# Altium PCB PCB1.PcbDoc (part 3 of 4)
Units mm, origin at the board's own origin, x right, y up, seen from the top; angles counter-clockwise.
Board outline 134.12 x 116.9 mm, 4 copper layers (Top Layer, Layer 1, Layer 2, Bottom Layer), stack 1.312 mm thick; 317 components, 155 nets, 807 pads, 898 vias.
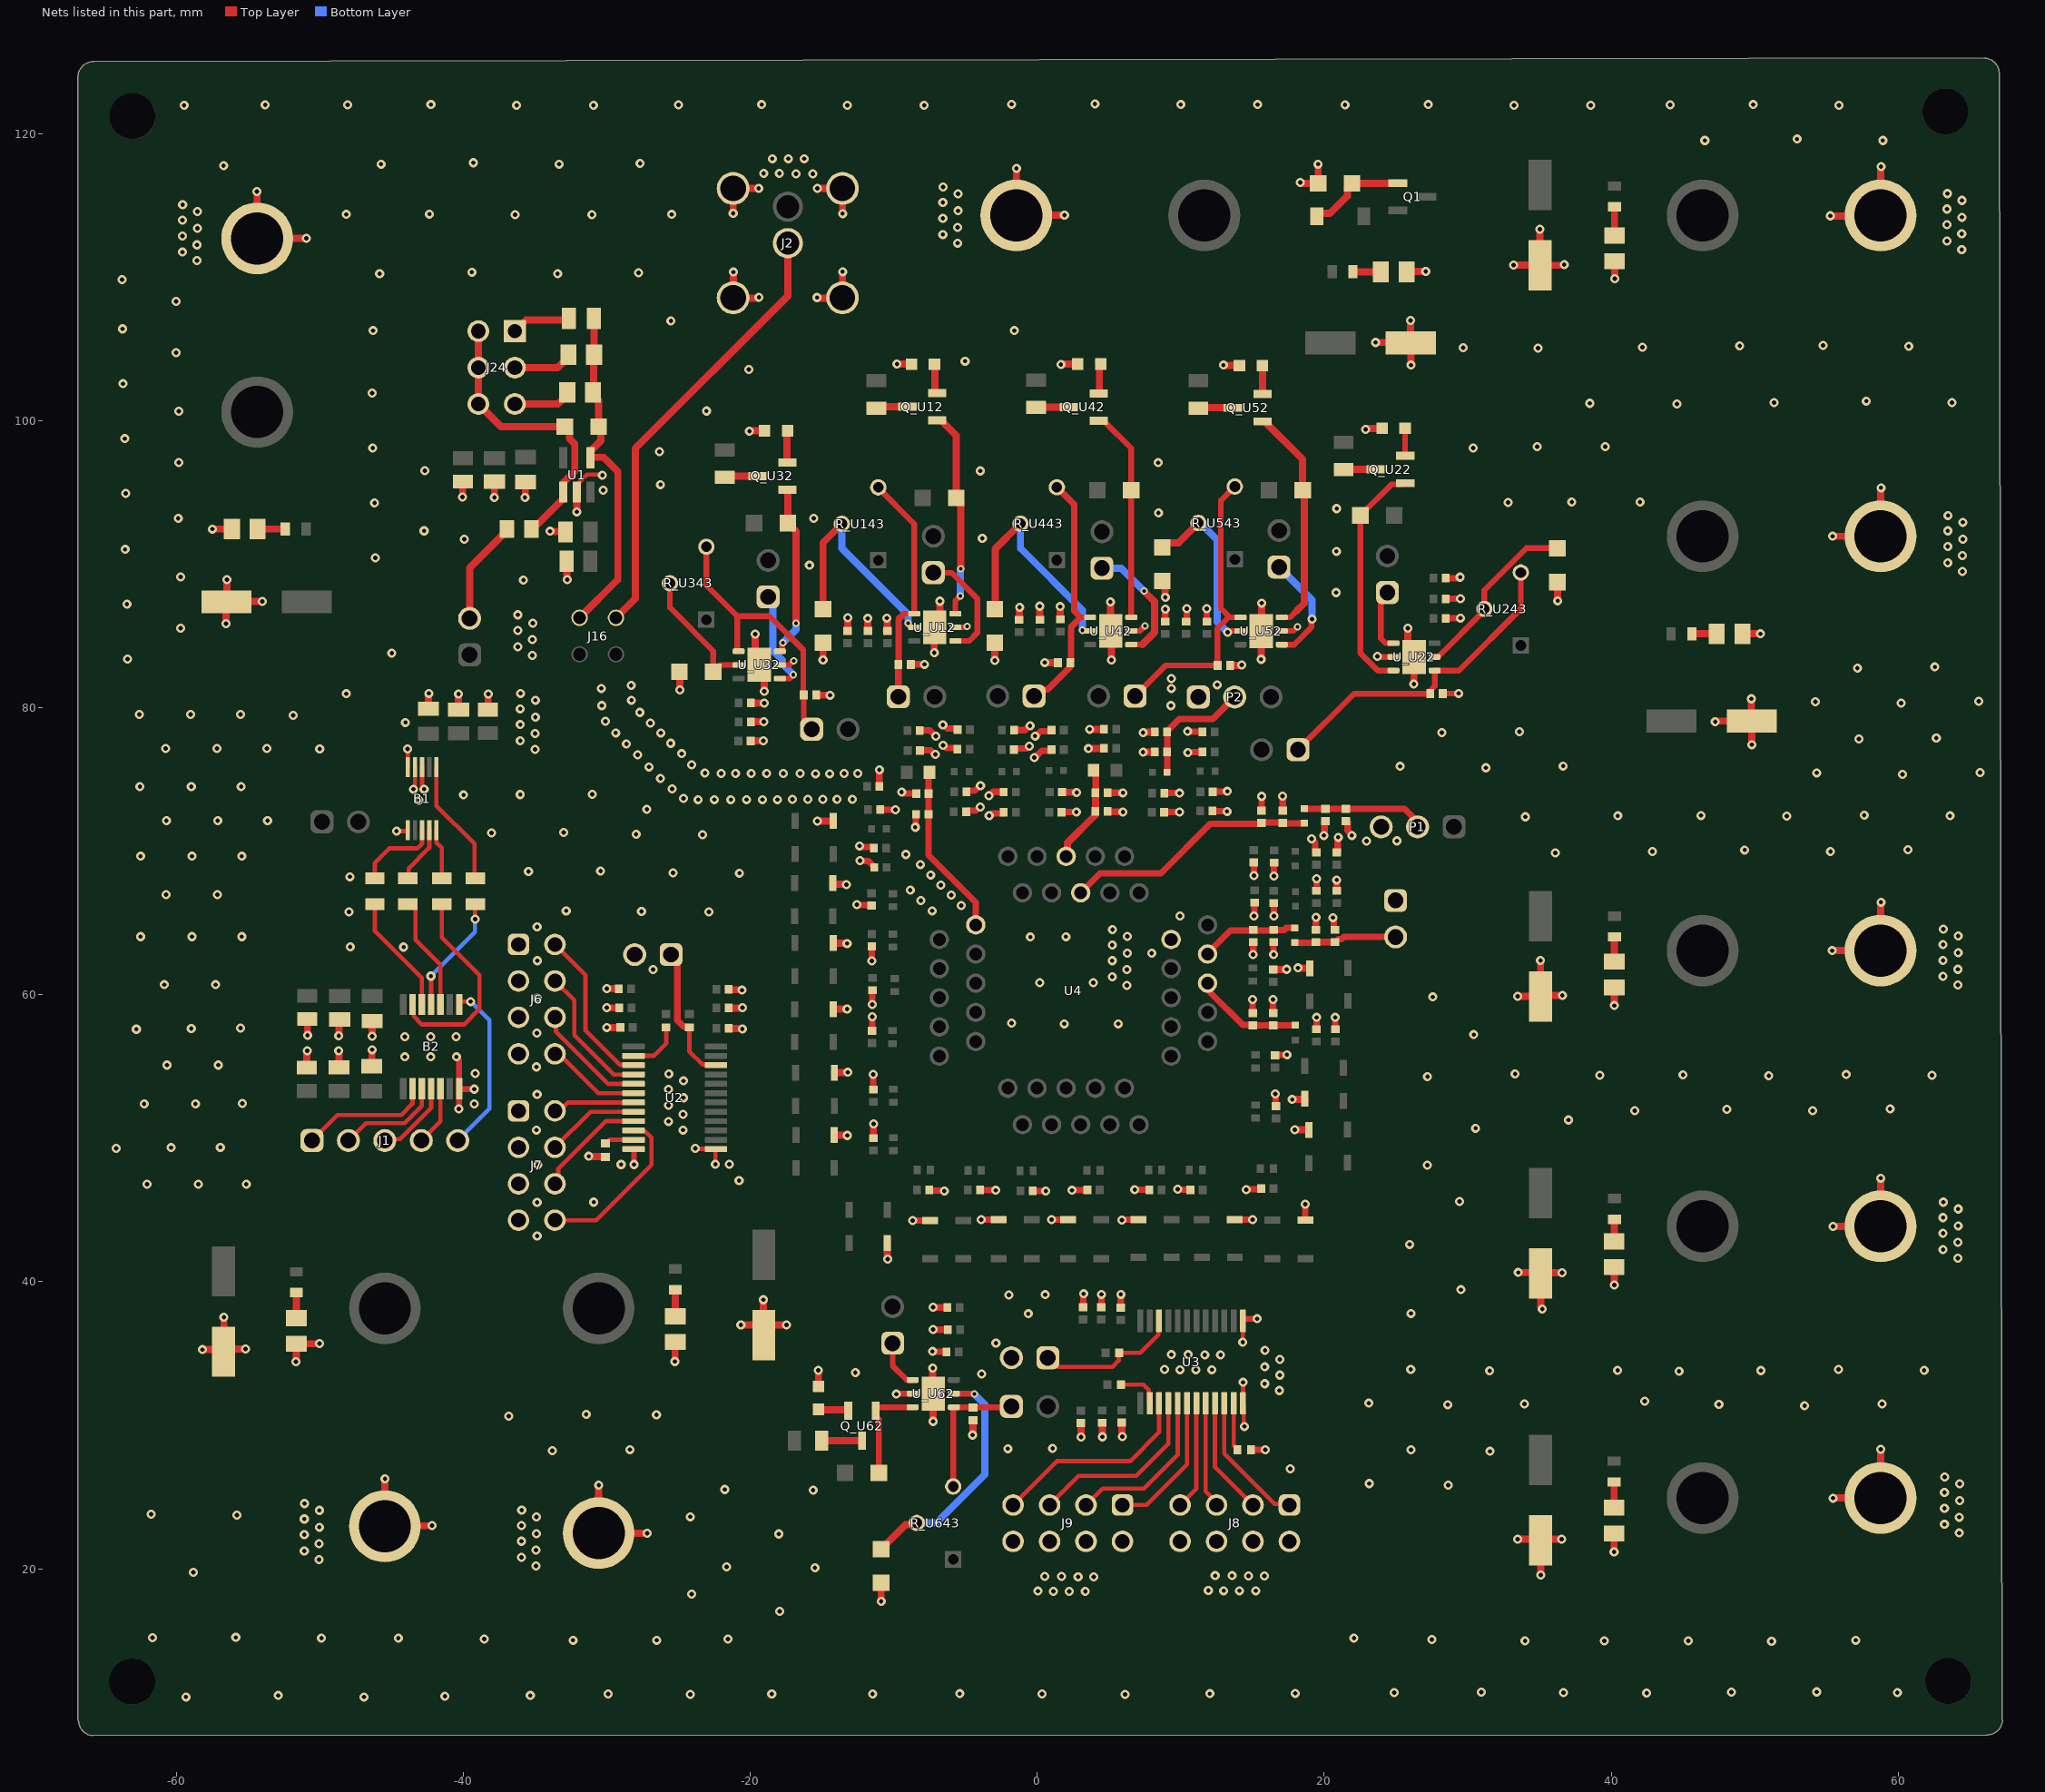
[diagram p5: the nets of this part, all layers, seen from the top]

## Via types
v1: diameter 0.635, hole 0.305, Top Layer to Bottom Layer, 880 vias
v2: diameter 0.508, hole 0.254, Top Layer to Bottom Layer, 17 vias
v3: diameter 0.504, hole 0.254, Top Layer to Bottom Layer, 1 vias

## Nets (pads, with @x,y where several pads share a name; then routed paths per layer and width w, separated by ;. In a path a pad name is that pad's centre, name@x,y a point inside that pad or via, vN(x,y) a via of type N, cw(c..) or ccw(c..) an arc to the next point about the centre after c; other vN are vias at no path point) (continued)
CHIPS_VSS: B1.3 B1.4 B1.5 B1.6 B2.7 C2.1 C3.1 C4.1 C5.1 C6.1 C7.1 C8.1 C9.1 C10.1 C11.1 C12.1 C13.1 C14.2 C15.1 C16.2 C17.1 C18.1 C19.1 C20.1 C21.1 C22.1 C23.1 C24.1 C25.1 C26.1 C27.1 C28.1 C29.1 C30.1 C31.2 C32.1 C33.2 C34.1 C35.1 C36.1 C37.1 C38.1 C39.1 C40.1 C41.1 C42.1 C43.1 C44.1 C45.1 C46.1 C47.1 C48.1 C49.1 C50.1 C51.1 C52.1 C53.1 C54.1 C55.1 C56.1 C57.2 C58.1 C59.1 C60.1 C62.1 C63.1 C67.1 C68.1 C69.1 C70.2 C71.1 C72.1 C73.1 C75.2 C76.1 C77.1 C78.1 C79.2 C80.1 C81.1 C86.1 C87.1 C88.1 C89.1 C90.1 C91.1 C92.1 C93.1 C94.1 C95.1 C96.1 C97.1 C98.1 C99.1 C100.1 C101.1 C102.1 C103.1 C104.2 C105.1 C106.1 C_U164.1 C_U165.1 C_U166.1 C_U167.1 C_U182.1 C_U183.1 C_U184.1 C_U185.1 C_U264.1 C_U265.1 C_U266.1 C_U267.1 C_U282.1 C_U283.1 C_U284.1 C_U285.1 C_U364.1 C_U365.1 C_U366.1 C_U367.1 C_U382.1 C_U383.1 C_U384.1 C_U385.1 C_U464.1 C_U465.1 C_U466.1 C_U467.1 C_U482.1 C_U483.1 C_U484.1 C_U485.1 C_U582.1 C_U583.1 C_U584.1 C_U585.1 C_U682.1 C_U683.1 C_U684.1 C_U685.1 D_U12.2 D_U14.2 D_U16.2 D_U18.2 D_U19.1 D_U22.2 D_U24.2 D_U26.2 D_U28.2 D_U29.1 D_U32.2 D_U34.2 D_U36.2 D_U38.2 D_U39.1 D_U42.2 D_U44.2 D_U46.2 D_U48.2 D_U49.1 D_U59.1 D_U69.1 J2.3 J2.4 J2.5 J2.6 J3.1 J6.1 J6.3 J6.5 J6.7 J7.1 J7.3 J7.5 J7.7 J8.2 J8.4 J8.6 J8.8 J9.2 J9.4 J9.6 J9.8 J18.1 J19.1 J20.1 J21.1 J22.1 J23.1 J25.1 J30.2 J31.2 J32.1 J33.1 P1.3 P2.1 R25.2 R26.2 R33.1 R_U17.1 R_U27.1 R_U37.1 R_U47.1 R_U57.1 R_U67.1 U1.2 U2.12 U2.13 U3.12 U3.13 U4.34 U_U12.2 U_U12.7 U_U22.2 U_U22.7 U_U32.2 U_U32.7 U_U42.2 U_U42.7 U_U52.2 U_U52.7 U_U62.2 U_U62.7 | length 346.8
  Top Layer w0.3: v1(-44.65,71.4) -43.863,71.4 B1.6@-43.863,71.465 ; v1(-43.875,77.125) -43.863,77.113 B1.5@-43.863,75.865 ; v1(-43.475,74.325) -43.475,74.416 -43.363,74.527 B1.4@-43.363,75.865 ; B1.3@-42.863,75.865 -42.863,74.554 -42.725,74.416 v1(-42.725,74.325) ; U1.2@-32.077,95.025 -31.948,95.155 -31.948,95.677 -31.375,96.25 -30.35,96.25 v1(-30.3,96.2) ; v1(-23.825,49.3) -23.798,49.273 U2.13@-22.327,49.273 ; v1(-22.425,48.2) -22.425,49.207 U2.13@-22.4,49.232 ; U3.12@14.3,31.45 14.395,31.355 14.395,29.98 v1(14.45,29.925) ; U3.12@14.325,31.825 14.345,31.845 14.345,32.995 v1(14.35,33) ; v1@14.325,35.825 14.333,35.833 14.333,37.272 U3.13@14.341,37.28
  Top Layer w0.4: v1(-40.475,55.675) -40.475,55.638 -40.283,55.446 B2.7@-40.283,53.45 -40.291,53.442 -40.291,52.059 v1(-40.3,52.05) ; B2.7@-40.258,53.475 -40.258,53.425 v1(-39.225,53.425) ; U2.12@-28.126,49.245 -28.105,49.245 -28.1,49.24 v1(-28.1,48.175) ; U_U32.2@-17.935,82.985 -17.267,82.985 -16.977,83.275 v2(-16.975,83.275) ; v1(-9.825,32.175) -9.79,32.21 U_U62.2@-8.679,32.21 ; U_U12.2@-5.7,85.602 -4.95,85.602 -4.877,85.675 v2(-4.875,85.675) ; U_U42.2@6.554,85.351 7.149,85.351 7.498,85.7 v2(7.5,85.7) ; U3.13@14.341,37.28 14.341,37.42 14.346,37.425 v1(15.325,37.425) ; U_U52.2@17.045,85.347 17.847,85.347 v3(18.15,85.65) ; v1(23.7,83.575) 23.732,83.543 U_U22.2@24.828,83.543 ; C_U282.1@28.272,80.987 v1@29.413,80.987
  Top Layer w0.45: v1(-12.575,66.275) -12.546,66.246 -11.543,66.246 C_U464.1@-11.53,66.233 ; v1(-12.375,70.375) -12.325,70.375 -12.25,70.3 -11.425,70.3 -11.375,70.25 C86.1@-11.375,70.225 ; v1(-12.35,69.35) -12.315,69.315 -11.762,69.315 -11.35,68.903 C87.1@-11.35,68.85 ; v1(-11.525,62.35) C_U466.1@-11.525,63.373 ; C_U467.1@-11.5,57.461 v1(-11.5,58.475) ; v1(-11.5,59.325) -11.482,59.343 C_U465.1@-11.482,60.315 ; C_U264.1@-11.425,53.402 v1(-11.425,54.45) ; C_U266.1@-11.412,50.009 -11.412,50.988 v1(-11.4,51) ; C48.1@-11,72.925 C48.1@-10.963,72.963 ; C49.1@-11,74.823 v1(-11,75.675) ; C48.1@-10.948,72.9 v1(-9.875,72.9) ; v1(-9.45,74.125) -9.4,74.125 -9.3,74.025 C43.1@-8.427,74.025 ; v1(-8.675,44.275) D_U24.2@-7.45,44.275 ; v1(-8.5,71.675) -8.466,71.709 -8.466,72.541 C47.1@-8.432,72.575 ; C58.1@-8.189,78.423 -7.473,78.423 v1(-7.075,78.025) ; C36.1@-8.175,77.015 -8.134,77.015 -8.123,77.025 -7.426,77.025 -7.15,76.75 v1(-7.1,76.75) ; C_U267.1@-7.536,46.393 -7.504,46.36 -6.51,46.36 v1(-6.475,46.325) ; v1(-7.3,35.15) -7.275,35.125 -6.352,35.125 C_U685.1@-6.327,35.1 ; v1(-7.25,36.675) -7.238,36.662 -6.24,36.662 C_U684.1@-6.227,36.65 ; v1(-7.25,38.225) -7.238,38.213 -6.304,38.213 -6.279,38.188 C_U683.1@-6.279,38.175 ; v1(-6.575,78.8) -6.525,78.8 -6.28,78.555 -5.598,78.555 C71.1@-5.598,78.55 ; v1(-6.55,77.375) -6.5,77.375 -6.325,77.2 -5.604,77.2 -5.604,77.154 C59.1@-5.55,77.1 ; C92.1@-4.939,74.125 -4.939,74.164 -4.878,74.225 -4.35,74.225 -4,74.575 v1(-3.95,74.575) ; C93.1@-4.93,72.737 -4.93,72.798 -4.903,72.825 -4.275,72.825 -4.025,73.075 v1(-3.975,73.075) ; C_U265.1@-3.987,46.373 -3.974,46.385 -2.91,46.385 v1(-2.9,46.375) ; v1(-3.9,44.325) D_U32.2@-2.681,44.325 ; v1(-3.375,73.875) -3.325,73.875 -3.062,74.137 -2.382,74.137 -2.369,74.125 C98.1@-2.332,74.125 ; v1(-3.35,72.475) -3.3,72.475 -3.125,72.65 -2.382,72.65 C99.1@-2.382,72.725 ; C67.1@-1.636,78.444 -0.849,78.444 -0.543,78.75 v1(-0.5,78.75) ; C72.1@-1.622,77.101 -1.573,77.15 -0.775,77.15 -0.6,77.325 v1(-0.55,77.325) ; C_U364.1@-0.35,46.325 v1(0.6,46.325) ; v1(-0.2,76.525) -0.15,76.525 0.323,76.998 0.945,76.998 1.017,77.07 C63.1@1.017,77.073 ; v1(-0.15,78.025) -0.115,78.06 -0.063,78.06 0.24,78.363 0.945,78.363 1.017,78.435 C62.1@1.017,78.438 ; v1(1,44.325) D_U36.2@2.15,44.325 ; C95.1@1.697,72.725 v1(2.725,72.725) ; C94.1@1.736,74.141 1.765,74.112 2.738,74.112 v1(2.75,74.1) ; v1(2.425,46.375) 2.435,46.385 3.501,46.385 C_U366.1@3.513,46.398 ; C106.1@3.208,38.213 3.217,38.222 3.217,39.148 v1(3.234,39.165) ; C29.1@4.467,38.173 4.467,39.117 v1(4.475,39.125) ; C39.1@4.85,74.075 v1(5.975,74.075) ; C40.1@4.925,72.775 4.95,72.75 5.95,72.75 v1(5.975,72.725) ; v1(5.825,39.125) C28.1@5.825,38.197 5.825,38.177 C28.1@5.837,38.165 ; v1@5.925,44.325 D_U38.2@7.066,44.325 ; v1(6.8,46.425) 6.807,46.418 C_U367.1@7.829,46.418 ; C97.1@8.837,72.737 8.85,72.725 v1(9.925,72.725) ; C96.1@8.837,74.037 8.85,74.05 v1(9.925,74.05) ; v1(8.925,86.875) 8.925,86.031 C_U583.1@8.975,86.031 ; v1@9.82,46.43 C_U365.1@10.677,46.43 ; v1(10.425,86.9) 10.425,86.029 C_U584.1@10.439,86.029 ; v1(10.475,78.35) 10.494,78.331 C37.1@11.512,78.331 ; v1(10.5,76.875) 10.524,76.899 C38.1@11.519,76.899 ; C_U585.1@11.825,85.975 v1(11.825,86.9) ; C52.1@12.2,72.823 12.236,72.787 13.213,72.787 v1(13.225,72.775) ; C51.1@12.237,74.162 13.237,74.162 v1(13.25,74.175) ; D_U34.2@13.761,44.325 v1(15,44.325) ; v1(14.575,46.425) 14.605,46.455 15.641,46.455 C_U164.1@15.661,46.475 ; R26.2@14.895,28.275 14.92,28.3 v1(15.9,28.3) ; C35.1@15.02,58.725 15.01,58.735 15.01,59.635 v1@15.025,59.65 ; v1(15.05,62.8) 15.058,62.808 15.058,63.653 C89.1@15.066,63.661 ; C60.1@15.071,69.202 15.074,69.2 C60.1@15.1,69.2 ; v1(15.1,65.5) v1@15.134,65.534 ; v1(15.1,68.3) C60.1@15.1,69.2 ; C60.1@15.125,69.225 C60.1@15.1,69.2 ; C73.1@15.134,66.416 v1@15.134,65.534 ; v1@15.142,65.526 v1@15.134,65.534 ; C60.1@15.15,69.2 C60.1@15.1,69.2 ; C91.1@15.625,72.825 15.637,72.837 15.637,73.812 v1(15.65,73.825) ; v1(16.425,59.675) 16.43,59.67 16.43,58.73 C19.1@16.435,58.725 ; v1@16.474,68.301 v1(16.5,68.275) C55.1@16.5,69.198 16.5,69.2 C55.1@16.498,69.202 ; v1@16.475,62.825 C88.1@16.475,63.678 C88.1@16.475,63.7 ; v1(16.5,65.5) C69.1@16.5,66.35 ; C69.1@16.508,66.416 C69.1@16.513,66.416 ; v1(16.6,53.1) 16.626,53.074 16.626,52.26 C_U166.1@16.664,52.223 ; C_U165.1@16.6,55.775 16.627,55.802 17.377,55.802 v1(17.4,55.825) ; v1(17.1,73.85) 17.113,73.838 17.113,72.84 C90.1@17.125,72.827 ; D_U12.2@18.675,44.325 18.68,44.325 18.68,45.395 v1(18.675,45.4) ; v1(19.125,70.875) 19.125,70.825 19.385,70.565 19.385,69.972 19.425,69.972 C42.1@19.472,69.925 ; C50.1@19.42,64.521 v1@19.42,65.395 ; C46.1@19.46,67.226 19.468,67.233 19.468,68.068 v1(19.475,68.075) ; C18.1@19.475,57.675 v1(19.475,58.425) ; v1(19.975,71.1) 19.975,71.15 20.025,71.2 20.025,72.046 C54.1@20.05,72.046 ; v1(20.6,65.375) 20.6,65.325 20.675,65.25 20.675,64.575 20.7,64.55 C53.1@20.75,64.55 ; C17.1@20.775,57.675 v1(20.775,58.425) ; C41.1@20.85,69.9 20.868,69.9 20.94,69.972 20.94,70.94 v1(20.975,70.975) ; C45.1@20.875,67.251 v1(20.875,68) ; C20.1@21.576,72.075 21.605,72.075 21.632,72.048 21.632,71.443 21.925,71.15 v1(21.925,71.1) ; C_U285.1@28.442,86.227 28.454,86.239 29.489,86.239 v1(29.5,86.25) ; C_U284.1@28.443,87.597 29.497,87.597 v1(29.5,87.6) ; C_U283.1@28.5,89.025 29.35,89.025 29.425,89.1 v1(29.475,89.1)
  Top Layer w0.5: v1(-58.175,35.275) -56.7,35.275 C14.2@-56.675,35.25 ; v1(-57.475,92.45) -56.2,92.45 C30.1@-56.1,92.35 ; C14.2@-56.7,35.125 C14.2@-56.675,35.15 ; v1@-56.675,37.5 C14.2@-56.675,35.25 ; v1(-56.525,85.85) -56.525,86.95 C33.2@-56.4,87.075 ; C33.2@-56.525,87.325 -56.45,87.4 v1(-54,87.4) ; C33.2@-56.475,87.55 v1(-56.475,88.925) ; v1@-55.2,35.3 -55.225,35.325 -56.5,35.325 C14.2@-56.675,35.15 ; v1(-54.375,115.975) -54.364,115.964 -54.364,112.739 -54.325,112.7 v1(-50.925,112.7) ; C13.1@-51.7,35.675 -51.637,35.612 -51.637,34.438 v1(-51.65,34.425) ; C13.1@-51.625,35.55 -51.491,35.684 -50.029,35.684 v1(-50.024,35.689) ; C9.1@-50.906,54.919 -50.89,54.934 -50.89,56.085 v1(-50.875,56.1) ; v1(-50.85,57.175) -50.853,57.178 -50.853,58.272 C12.1@-50.85,58.275 ; v1(-48.675,56.1) -48.665,56.09 -48.665,54.947 C10.1@-48.656,54.937 ; v1(-48.675,57.15) -48.649,57.176 C11.1@-48.649,58.249 ; C11.1@-48.631,58.253 C11.1@-48.607,58.277 ; C80.1@-46.371,55.026 -46.36,55.036 -46.36,56.165 v1(-46.35,56.175) ; v1(-46.35,57.1) -46.351,57.101 -46.351,58.149 C81.1@-46.225,58.275 ; v1(-45.45,26.275) -45.456,26.269 -45.456,22.981 J32.1@-45.425,22.95 ; J32.1@-45.325,23.075 -45.249,22.999 -42.201,22.999 v1(-42.175,23.025) ; C8.1@-42.425,79.92 -42.413,79.933 -42.413,80.962 v1@-42.425,80.975 ; v1@-40.35,80.925 -40.325,80.9 C7.1@-40.325,79.87 ; v1@-40.025,94.675 -40.037,94.687 -40.037,95.752 C3.1@-40.025,95.765 ; C6.1@-38.275,79.86 -38.263,79.872 -38.263,80.913 v1@-38.225,80.95 ; v1@-37.825,94.725 C4.1@-37.825,95.755 ; v1@-35.65,94.675 -35.675,94.7 -35.675,95.705 C5.1@-35.65,95.73 ; v1(-33.95,92.3) -33.925,92.275 -32.95,92.275 C105.1@-32.875,92.2 ; C2.1@-32.799,90.101 -32.772,90.074 -32.772,88.947 v1(-32.75,88.925) ; U1.2@-32.076,94.724 -32.076,93.651 v1(-32.075,93.65) ; v1(-31.25,48.75) -31.227,48.727 -30.114,48.727 R25.2@-30.091,48.704 ; J23.1@-30.675,22.5 -30.658,22.483 J23.1@-30.555,22.483 ; v1(-30.55,25.825) -30.555,25.82 J23.1@-30.555,22.483 ; J23.1@-30.5,22.25 -30.555,22.305 J23.1@-30.555,22.483 ; v1(-30,57.725) -29.986,57.711 -29.12,57.711 C23.1@-29.106,57.698 ; v1(-30,59.1) -29.984,59.084 -29.117,59.084 C22.1@-29.101,59.069 ; v1(-30,60.425) C100.1@-29.157,60.425 ; v1(-27.175,22.475) -27.183,22.483 J23.1@-30.555,22.483 ; v1(-25.25,34.45) -25.237,34.463 -25.237,35.712 C78.1@-25.25,35.725 ; v1(-24.9,81.25) -24.912,81.262 -24.912,82.36 R_U37.1@-24.825,82.447 ; C24.1@-21.525,57.653 -21.51,57.637 -20.562,57.637 v1(-20.55,57.625) ; C101.1@-21.51,60.425 -21.51,60.38 -21.48,60.35 -20.6,60.35 v1(-20.575,60.325) ; C25.1@-21.498,59.075 v1@-20.57,59.075 ; J2.6@-21.225,116.15 -21.194,116.181 v1@-19.413,116.181 ; J2.4@-21.2,108.525 -19.505,108.525 -19.424,108.606 v1(-19.388,108.606) ; J2.4@-21.2,108.6 -21.177,108.623 -21.177,110.342 v1(-21.163,110.356) ; J2.6@-21.2,116.1 -21.189,116.089 -21.189,114.457 v1(-21.188,114.456) ; v1(-20.65,37) C104.2@-19.175,37 ; v1(-20.05,99.275) -20.038,99.288 -18.962,99.288 D_U39.1@-18.95,99.3 ; C_U383.1@-19.95,77.7 v1(-19.075,77.7) ; C_U385.1@-19.95,80.325 C_U385.1@-19.948,80.325 v1(-19.025,80.325) ; C_U384.1@-19.9,79 -19.875,79.025 v1(-19.05,79.025) ; v1(-19.65,85.125) -19.65,83.35 U_U32.7@-19.35,83.05 ; U_U32.7@-19.37,82.985 -19.025,82.64 v1(-19.025,81.15) ; C104.2@-19.225,36.95 C104.2@-19.175,37 ; v1(-19.075,38.75) C104.2@-19.075,37 ; C104.2@-18.975,36.475 -19.075,36.575 C104.2@-19.075,36.95 ; C104.2@-18.75,36.625 C104.2@-19.075,36.95 ; v1(-17.475,37) C104.2@-19.075,37 ; C_U382.1@-15.375,80.875 v1(-14.425,80.875) ; v1(-15.338,108.581) -15.301,108.581 -15.245,108.525 J2.3@-13.625,108.525 ; v1(-15.325,72.1) -14.21,72.1 D_U42.2@-14.21,71.94 ; v1@-15.312,116.181 J2.5@-13.567,116.181 ; v1(-15.25,33.825) -15.242,33.817 D_U69.1@-15.242,32.668 ; R_U17.1@-14.95,84.32 -14.925,84.295 v1(-14.925,83.325) ; D_U46.2@-14.25,67.776 -14.25,67.701 -13.326,67.701 v1(-13.3,67.675) ; D_U44.2@-14.22,63.601 -14.22,63.588 -13.263,63.588 v1(-13.25,63.575) ; D_U48.2@-14.21,59.003 -13.253,59.003 v1(-13.25,59) ; D_U26.2@-14.141,50.24 -14.141,50.22 -13.245,50.22 v1(-13.225,50.2) ; D_U22.2@-14.134,54.558 -14.134,54.579 -13.221,54.579 v1(-13.2,54.6) ; J2.3@-13.6,108.575 -13.567,108.608 -13.567,110.377 v1(-13.563,110.381) ; J2.5@-13.6,116.225 -13.567,116.192 J2.5@-13.567,116.181 ; v1(-13.563,114.431) -13.567,114.435 J2.5@-13.567,116.181 ; J2.5@-13.475,116.175 -13.481,116.181 J2.5@-13.567,116.181 ; C_U183.1@-13.215,85.325 -13.208,85.333 -13.208,86.267 v1(-13.2,86.275) ; C_U184.1@-11.813,85.351 -11.801,85.363 v1@-11.801,86.224 ; v1@-10.875,17.762 R_U67.1@-10.875,18.574 ; C_U185.1@-10.501,85.379 C_U185.1@-10.473,85.352 ; C_U185.1@-10.475,85.35 C_U185.1@-10.473,85.352 ; v1(-10.475,86.25) -10.461,86.236 -10.461,85.364 C_U185.1@-10.473,85.352 ; D_U28.2@-10.439,42.716 -10.439,41.589 v1(-10.425,41.575) ; C_U185.1@-10.435,85.334 -10.456,85.334 C_U185.1@-10.473,85.352 ; v1(-9.775,103.95) -9.762,103.937 -8.725,103.937 D_U19.1@-8.712,103.923 ; C_U182.1@-8.8,83.021 -8.77,83.051 C_U182.1@-8.77,83.086 ; C_U182.1@-8.75,83 -8.725,83.025 v1(-7.85,83.025) ; U_U62.7@-7.275,32.25 v1(-7.275,34) ; v1(-7.25,30.275) -7.25,32.204 U_U62.7@-7.244,32.21 ; v1@-7.201,83.799 v1(-7.175,83.825) -7.175,85.562 U_U12.7@-7.135,85.602 -6.775,85.962 v1(-6.775,87.425) ; C92.1@-4.964,74.15 C92.1@-4.939,74.125 ; v1(-4.5,29.325) -4.481,29.344 -4.481,30.342 C_U682.1@-4.463,30.361 ; R_U47.1@-2.955,84.524 -2.953,84.521 -2.953,83.303 v1(-2.95,83.3) ; J19.1@-1.5,114.275 -1.452,114.323 -1.452,117.573 v1(-1.45,117.575) ; J19.1@-1.425,114.3 -1.413,114.312 1.887,114.312 v1(1.9,114.325) ; C_U483.1@-1.261,86.11 -1.243,86.128 -1.243,86.982 v1(-1.225,87) ; v1(0.175,87.075) 0.181,87.069 C_U484.1@0.181,86.116 ; v1(0.525,83.15) 0.528,83.147 1.441,83.147 C_U482.1@1.444,83.143 ; C_U485.1@1.623,86.139 1.611,86.151 1.611,87.061 v1@1.625,87.075 ; v1(1.65,103.925) 1.675,103.95 2.675,103.95 2.7,103.975 D_U49.1@2.79,103.975 ; v1(3.05,29.175) C102.1@3.05,30.168 ; v1(3.575,77.15) C21.1@4.621,77.15 ; v1(3.65,78.5) 4.623,78.5 C34.1@4.623,78.525 ; C26.1@4.525,30.173 4.537,30.161 4.537,29.213 v1(4.55,29.2) ; v1(5.1,87.375) 5.1,85.37 U_U42.7@5.119,85.351 5.175,85.295 v1(5.175,83.325) ; v1(5.9,44.3) v1@5.925,44.325 ; C27.1@5.912,30.214 5.912,29.237 v1(5.925,29.225) ; v1(7.375,76.9) 7.387,76.913 8.208,76.913 C68.1@8.216,76.921 ; v1(7.375,78.275) 7.392,78.292 8.187,78.292 C44.1@8.212,78.317 ; R_U57.1@8.875,88.75 8.899,88.726 8.899,87.726 v1(8.925,87.7) ; v1(9.8,46.45) v1@9.82,46.43 ; C_U365.1@10.677,46.43 C_U365.1@10.697,46.411 ; v1(12.975,103.875) 12.993,103.857 14.08,103.857 D_U59.1@14.097,103.875 ; C_U582.1@13.443,82.946 13.457,82.961 14.236,82.961 v1(14.25,82.975) ; v1(15.6,83.375) 15.6,84.673 15.755,84.829 15.644,84.829 v1(15.644,87.292) ; C_U167.1@16.435,61.74 16.464,61.768 17.368,61.768 v1(17.375,61.775) ; v1(17.775,52.7) 17.8,52.725 18.655,52.725 D_U14.2@18.655,52.575 ; v1(17.95,50.6) 17.963,50.588 18.925,50.588 D_U16.2@18.925,50.575 ; v1@18.205,61.845 D_U18.2@18.982,61.845 ; v1@18.3,116.625 18.337,116.625 18.417,116.545 R33.1@19.58,116.545 ; D_U12.2@18.685,44.3 D_U12.2@18.692,44.3 ; C50.1@19.414,64.516 C50.1@19.42,64.521 ; v1@19.42,65.395 v1(19.425,65.4) ; v1(19.575,117.875) 19.578,117.872 19.578,116.647 R33.1@19.625,116.6 ; v1(22.875,99.4) 22.912,99.4 22.974,99.462 23.888,99.462 23.9,99.45 D_U29.1@24.025,99.45 ; v1(23.575,105.45) 26,105.45 26.025,105.475 v1(26.025,106.975) ; C77.1@25.775,110.375 25.79,110.39 27.065,110.39 v1(27.075,110.4) ; v1(25.825,85.55) 25.825,83.981 U_U22.7@26.263,83.543 ; v1(26.05,103.875) C75.2@26.05,105.325 ; v1(26.25,81.65) U_U22.7@26.25,83.5 ; U_U22.7@26.6,84.125 U_U22.7@26.65,84.175 ; C_U282.1@28.26,80.975 C_U282.1@28.272,80.987 ; v1@29.413,80.987 v1@29.425,80.975 ; v1(33.2,110.85) 35.016,110.85 C79.2@35.041,110.825 36.638,110.825 36.688,110.875 v1(36.725,110.875) ; v1@33.45,59.875 v1(33.475,59.9) 35.055,59.9 C57.2@35.075,59.88 ; v1(33.475,22.075) 35.035,22.075 C16.2@35.05,22.06 ; v1(33.525,40.65) 35.036,40.65 35.061,40.625 v1(36.575,40.625) ; v1(35.025,113.35) 35.025,111.15 C79.2@35.05,111.125 ; v1(35.075,62.4) 35.075,60.025 C57.2@35.175,59.925 ; v1(35.1,19.575) 35.1,22.01 C16.2@35.05,22.06 ; C70.2@35.1,39.211 35.1,39.086 35.1,38.237 35.2,38.137 v1(35.2,38.1) ; C57.2@35.125,59.875 C57.2@35.175,59.925 ; R_U27.1@36.25,88.675 36.263,88.662 36.263,87.463 v1(36.275,87.45) ; v1(36.55,22.06) C16.2@35.05,22.06 ; v1(36.6,59.95) 35.2,59.95 C57.2@35.175,59.925 ; v1@40.15,21.175 40.2,21.225 C103.1@40.2,22.463 ; C56.1@40.2,40.95 40.213,40.937 40.213,39.787 v1(40.225,39.775) ; C32.1@40.2,60.425 40.225,60.4 v1(40.225,59.25) ; C76.1@40.227,111.223 40.239,111.211 40.239,109.911 v1(40.25,109.9) ; v1(47.25,79.025) 47.287,79.025 47.337,79.075 49.775,79.075 49.8,79.05 v1(49.8,77.425) ; C15.1@49.147,85.15 50.338,85.15 50.375,85.113 v1@50.375,85.1 ; C31.2@49.775,79.125 v1(49.775,80.625) ; v1(55.275,114.275) 55.3,114.25 58.65,114.25 58.787,114.388 58.787,117.687 v1(58.8,117.7) ; v1(55.4,63.075) 55.403,63.078 J22.1@58.753,63.078 ; v1(55.425,91.95) 55.426,91.949 58.626,91.949 J18.1@58.65,91.925 ; v1(55.45,24.925) 55.458,24.933 58.767,24.933 J33.1@58.775,24.925 ; v1(55.45,43.85) 55.457,43.857 58.557,43.857 J25.1@58.575,43.875 ; J33.1@58.75,24.55 58.775,24.575 J33.1@58.775,24.925 ; J22.1@58.75,63.075 J22.1@58.753,63.078 ; v1(58.775,28.325) J33.1@58.775,24.925 ; v1(58.775,47.225) 58.775,43.925 J25.1@58.825,43.875 ; J22.1@58.8,63.05 58.772,63.078 J22.1@58.753,63.078 ; v1(58.8,66.45) 58.788,66.438 58.788,63.113 J22.1@58.753,63.078 ; v1(58.8,95.325) 58.787,95.312 58.787,91.938 J18.1@58.85,91.875 ; J33.1@58.85,24.85 J33.1@58.775,24.925 ; C14.2@-56.675,35.15 C14.2@-56.675,35.25 ; C104.2@-19.175,37 C104.2@-19.125,37 ; C104.2@-19.125,37 C104.2@-19.075,37 ; C104.2@-19.125,37 C104.2@-19.075,36.95 ; C104.2@-19.075,36.95 C104.2@-19.075,37
  other v1: -59.325,11.075 -46.925,11.075 -41.275,11.125 -52.9,11.175 -35.325,11.175 -24.175,11.25 6.125,11.25 -29.9,11.275 -18.5,11.275 -11.475,11.275 0.325,11.275 -5.4,11.3 12.025,11.3 17.975,11.325 42.475,11.35 24.875,11.375 36.675,11.375 59.937,11.372 30.95,11.4 48.375,11.4 54.325,11.425 51.175,14.95 34,14.975 39.525,14.975 45.375,14.975 -32.35,15.025 -26.525,15.025 57.05,15.025 27.5,15.075 -38.525,15.1 -21.55,15.1 -49.875,15.175 -44.525,15.175 22.075,15.175 -61.65,15.2 -55.85,15.225 -17.941,17.031 -10.875,17.725 -24.091,18.231 1.125,18.425 2.225,18.425 3.35,18.425 0.05,18.45 13,18.475 14.1,18.475 15.225,18.475 11.925,18.5 2.85,19.45 3.95,19.45 0.525,19.475 1.7,19.475 14.725,19.5 15.825,19.5 12.4,19.525 13.575,19.525 -58.8,19.75 -15.491,20.081 -21.641,20.131 -34.925,20.2 -50.05,20.65 -35.95,20.8 40.2,21.175 -51.075,21.25 -34.925,21.3 -50.05,21.75 -35.95,21.925 -51.075,22.375 -34.9,22.45 -18.016,22.431 64.25,22.5 -50.025,22.9 -35.95,23.025 63.225,23.1 -51.075,23.475 64.25,23.6 -34.9,23.625 -24.166,23.631 -55.775,23.75 -61.75,23.8 -50.025,24.075 -35.925,24.1 63.225,24.225 -51.05,24.55 64.275,24.75 63.225,25.325 -15.616,25.481 -21.766,25.531 28.631,25.841 64.275,25.925 23.131,25.941 63.25,26.4 17.625,26.975 31.556,28.191 -33.781,28.234 26.056,28.291 -28.381,28.309 -2.05,28.375 1.075,28.4 -36.831,30.634 -26.531,30.734 -31.431,30.759 53.481,31.366 28.606,31.441 47.506,31.466 58.881,31.491 33.95,31.5 23.106,31.541 42.325,31.675 16.875,32.425 15.85,32.9 16.9,33.5 -3.875,33.575 -12.675,33.675 44.725,33.775 31.531,33.791 40.45,33.825 50.431,33.816 61.806,33.841 9.95,33.875 11.05,33.875 12.175,33.875 8.875,33.9 26.031,33.891 55.831,33.891 15.85,34.075 16.9,34.6 9.35,34.925 10.525,34.925 11.675,34.9 12.775,34.9 15.875,35.225 -55.175,35.325 -2.875,35.725 14.325,35.8 -56.675,37.525 -0.625,37.775 26.05,37.8 -1.975,39.075 0.55,39.1 29.525,39.45 64.15,41.65 63.125,42.25 25.959,42.606 64.15,42.75 -34.85,43.2 63.125,43.375 64.175,43.9 63.125,44.475 64.175,45.075 -34.85,45.525 -30.9,45.55 63.15,45.55 29.434,45.606 -62.037,46.802 -58.462,46.802 -55.12,46.805 -20.775,47.05 27.184,48.131 -34.8,48.15 -29,48.175 -21.45,48.2 -64.175,49.3 -60.35,49.35 -56.925,49.375 -34.9,50.575 -24.675,50.575 30.55,50.7 -25.7,51.175 37.025,51.275 -24.675,51.675 41.631,51.916 54.031,51.916 48.056,52.016 59.431,52.041 -25.7,52.3 -39.225,52.4 -62.237,52.402 -58.662,52.402 -55.395,52.43 -24.65,52.825 -34.85,53.05 -25.7,53.4 -24.65,54 27.2,54.3 50.981,54.366 39.206,54.391 62.356,54.391 45.006,54.416 56.381,54.441 -25.675,54.475 33.3,54.475 -39.175,54.525 -34.9,54.975 -60.637,55.102 -57.062,55.102 -44.075,55.675 -42.275,55.675 -44.075,57.075 -42.275,57.075 -40.5,57.075 30.425,57.225 -34.875,57.325 -62.775,57.6 -58.95,57.65 -55.525,57.675 1.875,57.975 5.65,57.975 -1.775,58.025 -20.545,59.1 15,59.675 -34.85,59.75 27.575,59.85 6.25,60.65 64.15,60.675 -60.837,60.702 -57.262,60.702 0.175,60.85 3.9,60.85 5.225,61.25 63.125,61.275 -26.775,61.75 6.25,61.75 64.15,61.775 18.175,61.875 -34.825,62.375 5.225,62.375 63.125,62.4 16.475,62.8 6.275,62.9 7.975,62.9 64.175,62.925 -44.15,63.325 -47.875,63.35 5.225,63.475 63.125,63.5 -0.475,64.025 -62.487,64.052 -58.912,64.052 -55.437,64.052 2,64.05 6.275,64.075 64.175,64.1 5.25,64.55 63.15,64.575 -34.85,64.725 9.95,65.5 -47.95,65.775 -22.875,65.775 -27.575,65.8 -32.825,65.85 -7.325,65.85 -5.3,66.225 -8.1,66.575 -6,66.95 -60.712,66.977 -57.137,66.977 -8.85,67.3 -6.725,67.65 -47.9,68.225 -7.425,68.35 -20.75,68.475 -25.375,68.5 -35.45,68.6 -30.425,68.625 -8.15,69.075 -62.487,69.652 -58.912,69.652 -55.437,69.652 -9.15,69.775 36.106,69.891 42.881,69.991 55.281,69.991 49.306,70.091 60.681,70.116 22.95,70.7 25.075,70.725 -23.325,71.15 -27.95,71.175 -38.025,71.275 -33,71.3 -60.687,72.127 -57.112,72.127 -53.637,72.127 34.025,72.4 40.456,72.466 52.231,72.441 63.606,72.466 46.256,72.491 57.631,72.516 -27.2,72.925 -43.075,73.55 -23.625,73.6 -22.5,73.6 -21.35,73.6 -20.25,73.6 -19.15,73.6 -18.1,73.6 -17.05,73.625 -15.975,73.625 -14.95,73.625 -13.95,73.625 -12.875,73.625 -24.65,73.675 -39.975,73.925 -36.025,73.95 -31,73.975 -25.45,74.35 -62.525,74.5 -58.95,74.5 -55.475,74.5 -26.25,75.075 60.306,75.366 -15.45,75.4 -14.475,75.4 -22.025,75.425 -21.025,75.425 -19.925,75.425 -18.85,75.425 -17.7,75.425 -16.525,75.425 -13.45,75.425 -12.5,75.425 -23.15,75.45 54.331,75.466 65.706,75.491 31.256,75.816 -27.05,75.875 25.281,75.916 36.656,75.941 -24.075,76.025 -27.85,76.725 -24.775,76.8 -35,77.1 -50,77.125 -60.737,77.152 -57.162,77.152 -53.687,77.152 -28.625,77.475 -25.55,77.525 -36.025,77.7 57.256,77.816 62.656,77.891 -35,78.2 -29.375,78.25 -26.225,78.25 28.206,78.266 33.606,78.341 -36.025,78.825 -26.95,78.925 -44.025,78.975 -30.1,79.05 -34.975,79.35 -51.85,79.475 -62.575,79.525 -59,79.525 -55.525,79.525 -27.7,79.675 -36.025,79.925 -30.35,80.15 9.325,80.15 60.206,80.316 54.231,80.416 65.606,80.441 -34.975,80.525 -28.275,80.525 -48.15,80.975 -40.325,80.95 -38.25,80.95 -42.4,81 -36,81 29.375,81 -30.375,81.35 9.35,81.35 -28.3,81.55 12.55,81.6 9.35,82.025 57.156,82.766 62.556,82.841 -63.386,83.384 -35.175,83.65 -44.975,83.8 -36.2,84.25 -35.175,84.75 50.4,85.15 -36.2,85.375 -59.688,85.547 -35.15,85.9 -11.8,86.225 -36.2,86.475 1.6,87.05 -63.436,87.209 20.825,88.025 -35.8,88.9 -59.688,89.122 64.475,89.5 -15.875,89.925 63.45,90.1 -46.125,90.45 64.475,90.6 20.85,90.9 -63.561,91.034 63.45,91.225 -39.925,91.75 64.5,91.75 -3.825,91.8 -42.725,92.325 63.45,92.325 64.5,92.925 -59.863,93.197 -15.575,93.2 63.475,93.4 8.45,93.575 20.875,93.875 -46.175,94.275 32.825,94.3 37.256,94.341 42.006,94.341 -37.825,94.65 -35.7,94.65 -40.05,94.675 -63.525,94.925 -30.25,95.15 -26.25,95.55 -3.975,96.5 -42.675,96.525 8.425,97.075 -59.827,97.088 -26.325,97.85 30.381,98.091 -46.3,98.1 34.831,98.191 39.581,98.191 -63.575,98.75 -59.827,100.663 -23.05,100.675 44.581,101.166 38.501,101.214 51.356,101.266 63.756,101.266 57.781,101.366 -46.35,101.925 -63.7,102.575 -20.1,103.575 -5.025,104.15 -60.002,104.738 34.901,105.064 29.676,105.089 42.181,105.116 60.731,105.191 48.956,105.216 54.756,105.241 -46.275,106.275 -1.6,106.275 -63.75,106.4 -25.525,106.95 -60.002,108.313 -63.775,109.825 -45.825,110.25 -33.425,110.25 -27.775,110.3 -39.4,110.35 -58.55,111.15 -59.575,111.75 64.425,111.925 -58.55,112.25 -5.55,112.375 63.4,112.525 -59.575,112.875 -6.575,112.975 64.425,113.025 -58.525,113.4 -5.55,113.475 63.4,113.65 -59.575,113.975 -6.575,114.1 64.45,114.175 -36.375,114.35 -31.025,114.35 -48.15,114.375 -25.475,114.375 -42.35,114.4 -58.525,114.575 -5.525,114.625 63.4,114.75 -59.55,115.05 -6.575,115.2 64.45,115.35 -5.525,115.8 63.425,115.825 -19.413,116.181 -15.313,116.181 -6.55,116.275 18.325,116.6 -16.813,117.206 -15.638,117.206 -19.063,117.231 -17.963,117.231 -56.699,117.764 -45.725,117.875 -33.325,117.875 -27.675,117.925 -39.3,117.975 -18.463,118.256 -17.338,118.256 -16.238,118.256 46.525,119.525 58.925,119.525 52.95,119.625 -59.45,121.975 -36.275,121.975 -30.925,121.975 -13.225,121.975 -7.875,121.975 33.225,121.975 38.575,121.975 55.875,121.975 -53.799,122.014 -48.05,122 -25,122 21.45,122 44.1,122 -42.25,122.025 -19.2,122.025 10,122.025 15.35,122.025 27.25,122.025 49.9,122.025 -1.775,122.05 4.025,122.075
CTT_ARRAY_ISO_DNW_BIAS_SAFE: C19.2 C35.2 R8.2 U4.31 | length 7.7
  Top Layer w0.45: U4.31@11.775,60.925 12.044,60.656 12.044,60.181 14.329,57.896 15.004,57.896 C35.2@15.025,57.875 ; C35.2@15.02,57.871 16.396,57.871 C19.2@16.4,57.875 ; C19.2@16.435,57.871 17.971,57.871 R8.2@17.975,57.875
CTT_ARRAY_ISO_PW_BIAS_SAFE: C90.2 C91.2 R15.2 U4.40 | length 17.7
  Top Layer w0.45: U4.40@3.032,67.107 4.393,68.468 8.618,68.468 12.073,71.923 15.6,71.923 C91.2@15.666,71.99 ; C91.2@15.625,71.995 17.125,71.995 17.17,71.95 17.32,71.95 17.322,71.948 R15.2@18.622,71.948
CTT_GATE63_MEAS_SAFE: C88.2 C89.2 R14.2 U4.33 | length 6.9
  Top Layer w0.45: U4.33@11.839,62.858 13.458,64.477 15.009,64.477 C89.2@15.109,64.577 ; C89.2@15.066,64.471 C88.2@16.475,64.471 ; C88.2@16.475,64.51 17.21,64.51 17.358,64.658 R14.2@17.96,64.658
FB: J24.2 J24.4 J24.6 R1.2 R2.1 U1.1 | length 20.1
  Top Layer w0.5: J24.2@-38.85,106.15 -38.94,106.06 J24.4@-38.94,103.7 J24.6@-38.94,101.16 -37.367,99.587 R1.2@-32.92,99.587 -32.595,99.262 -32.595,98.745 -32.225,98.375 -32.225,96.475 -32.998,95.702 -32.998,95.377 U1.1@-33,95.375 ; R2.1@-35.25,92.45 -35.25,92.551 -34.991,92.81 -34.786,92.81 -33.027,94.568 U1.1@-33.027,95.025
FPGA_IO56_ADCCLK: B2.13 R4.2 | length 14.8
  Top Layer w0.3: B2.13@-43.575,59.55 -43.458,59.433 -43.458,58.515 -42.868,57.925 -39.95,57.925 -38.863,59.012 -38.863,61.357 -41.485,63.98 R4.2@-41.485,66.323
FPGA_IO57_ADCDOUT: B2.10 R6.2 | length 7.8
  Top Layer w0.3: R6.2@-43.856,66.323 -43.589,66.323 -43.332,66.067 -43.332,63.828 -41.583,62.078 -41.583,59.683 B2.10@-41.525,59.625
FPGA_IO58_ADCDIN: B2.12 R5.2 | length 8.1
  Top Layer w0.3: R5.2@-46.159,66.323 -46.159,64.461 -42.883,61.185 -42.883,59.583 B2.12@-42.85,59.55
FPGA_IO59_ADC_SEL: B2.11 R3.2 | length 8.4
  Top Layer w0.3: v1(-42.25,61.3) -42.241,61.291 -42.241,59.241 B2.11@-42.225,59.225 ; v1(-39.175,65.275) -39.175,66.303 R3.2@-39.154,66.323
  Bottom Layer w0.3: v1(-42.25,61.3) -39.175,64.375 v1(-39.175,65.275)
NetB1_1: B1.1 R3.1 | length 8.9
  Top Layer w0.3: B1.1@-41.863,75.865 -41.863,73.173 -39.215,70.525 -39.215,68.188 R3.1@-39.154,68.127
NetB1_8: B1.8 R5.1 | length 5.8
  Top Layer w0.3: R5.1@-46.159,68.127 -46.159,69.191 -45.15,70.2 -43.2,70.2 -42.863,70.537 B1.8@-42.863,71.465
NetB1_9: B1.9 R6.1 | length 4
  Top Layer w0.3: R6.1@-43.856,68.127 -43.793,68.19 -43.793,68.807 -42.363,70.237 B1.9@-42.363,71.465
NetB1_10: B1.10 R4.1 | length 3.5
  Top Layer w0.3: B1.10@-41.863,71.465 -41.863,70.613 -41.485,70.235 R4.1@-41.485,68.127
NetB2_2: B2.2 J1.1 | length 9.1
  Top Layer w0.3: J1.1@-50.543,49.845 -48.763,51.625 -44.311,51.625 -43.533,52.404 B2.2@-43.533,53.45
NetB2_3: B2.3 J1.2 | length 7.3
  Top Layer w0.3: J1.2@-48.003,49.845 -46.788,51.06 -44.073,51.06 -42.883,52.25 B2.3@-42.883,53.45
NetB2_4: B2.4 J1.3 | length 5.5
  Top Layer w0.3: J1.3@-45.463,49.845 -45.358,49.95 -44.4,49.95 -42.233,52.117 B2.4@-42.233,53.45
NetB2_5: B2.5 J1.4 | length 4.2
  Top Layer w0.3: J1.4@-42.923,49.845 -41.583,51.185 B2.5@-41.583,53.45
NetB2_8: B2.8 J1.5 | length 12.1
  Top Layer w0.3: B2.8@-40.283,59.326 -40.283,59.451 -40.208,59.526 v1(-39.48,59.526)
  Bottom Layer w0.3: J1.5@-40.383,49.845 -38.175,52.053 -38.175,58.22 v1(-39.48,59.526)
NetC1_1: C1.1 C61.1 C74.1 J16.1 R1.1 U1.4 | length 24
  Top Layer w0.5: J16.1@-31.89,86.265 -29.219,88.936 -29.219,96.459 -30.21,97.45 U1.4@-31.075,97.45 ; U1.4@-31.127,97.413 -31.127,97.87 -30.4,98.597 R1.1@-30.4,99.2 ; C61.1@-30.953,101.975 C61.1@-30.95,101.978 ; C61.1@-30.95,102.325 C61.1@-30.95,101.978 ; C1.1@-30.95,107.3 -30.892,107.242 -30.892,104.613 C74.1@-30.878,104.6 ; C74.1@-30.825,104.625 -30.916,104.534 -30.916,102.012 C61.1@-30.95,101.978 ; R1.1@-30.57,99.587 -30.57,101.426 -30.95,101.807 C61.1@-30.95,101.978
NetC1_2: C1.2 J24.1 | length 4.5
  Top Layer w0.5: J24.1@-36.712,106.038 -36.602,106.038 -35.615,107.025 -32.745,107.025 C1.2@-32.645,107.125
NetC13_2: C13.2 R39.1 | length 1.7
  Top Layer w0.5: R39.1@-51.625,39.25 -51.625,37.575 C13.2@-51.575,37.525
NetC15_2: C15.2 R35.1 | length 1.9
  Top Layer w0.5: R35.1@45.625,85.15 C15.2@47.353,85.15 C15.2@47.475,85.15
NetC20_2: C20.2 C54.2 P1.2 R15.1 | length 8.7
  Top Layer w0.45: R15.1@18.642,72.952 20.111,72.952 25.603,72.952 P1.2@26.855,71.7
NetC30_2: C30.2 R36.1 | length 1.9
  Top Layer w0.5: C30.2@-54.275,92.425 -54.25,92.45 R36.1@-52.396,92.45
NetC32_2: C32.2 R37.1 | length 1.7
  Top Layer w0.5: C32.2@40.225,62.312 40.225,63.955 40.27,64 R37.1@40.275,64
NetC44_2: C44.2 C68.2 P2.2 R19.1 | length 8.5
  Top Layer w0.45: C68.2@9.052,76.917 C44.2@9.052,78.308 ; C44.2@9.06,78.341 9.077,78.358 9.077,78.402 9.9,79.225 12.237,79.225 P2.2@13.761,80.749 ; R19.1@9.062,75.6 C68.2@9.062,76.936
NetC50_2: C50.2 C53.2 J3.2 R14.1 | length 7.2
  Top Layer w0.45: R14.1@17.96,63.634 19.381,63.634 C50.2@19.42,63.673 ; C50.2@19.422,63.671 20.775,63.671 20.979,63.875 21.205,63.875 21.36,64.03 J3.2@24.975,64.03
NetC56_2: C56.2 R38.1 | length 1.5
  Top Layer w0.5: R38.1@40.225,44.35 40.213,44.338 40.213,42.987 C56.2@40.325,42.875
NetC61_2: C61.2 J24.5 | length 4.2
  Top Layer w0.5: J24.5@-36.4,101.16 -33.397,101.16 -32.75,101.807 C61.2@-32.75,102.1
NetC74_2: C74.2 J24.3 | length 4.4
  Top Layer w0.5: J24.3@-36.4,103.7 -33.407,103.7 -32.625,104.482 C74.2@-32.625,104.775
NetC76_2: C76.2 R41.1 | length 2.1
  Top Layer w0.5: C76.2@40.225,112.825 40.229,112.829 R41.1@40.229,114.901
NetC77_2: C77.2 R40.1 | length 1.9
  Top Layer w0.5: R40.1@22.025,110.375 22.03,110.38 C77.2@23.943,110.38
NetC78_2: C78.2 R42.1 | length 1.9
  Top Layer w0.5: C78.2@-25.225,37.597 -25.225,39.4 R42.1@-25.175,39.45
NetC103_2: C103.2 R34.1 | length 1.8
  Top Layer w0.5: C103.2@40.2,24.275 R34.1@40.2,26.055
NetC_U182_2: C_U182.2 J_U126.1 R_U143.3 U_U12.4 | length 16.6
  Top Layer w0.4: R_U143.3@-11.075,95.6 R_U143.3@-11.075,95.355 -11.075,95.312 -8.57,92.807 U_U12.4@-8.57,86.552 ; J_U126.1@-9.676,80.801 J_U126.1@-9.625,80.75 ; C_U182.2@-9.676,83.015 C_U182.2@-9.67,83.021 ; -9.271,86.554 U_U12.4@-8.74,86.554
  Top Layer w0.45: J_U126.1@-9.676,80.801 C_U182.2@-9.676,83.015 ; C_U182.2@-9.67,83.021 -9.67,86.154 -9.271,86.554
NetC_U282_2: C_U282.2 J_U226.1 R_U243.3 U_U22.4 | length 22.9
  Top Layer w0.4: J_U226.1@18.17,77.075 22.07,80.975 C_U282.2@27.39,80.975 ; C_U282.2@27.39,80.982 27.39,81.195 27.698,81.503 U_U22.4@27.698,82.593 29.393,82.593 33.7,86.9 R_U243.3@33.7,89.425
NetC_U382_2: C_U382.2 J_U326.1 R_U343.3 U_U32.4 | length 19.4
  Top Layer w0.4: R_U343.3@-23.05,91.172 -23.05,88.528 -20.9,86.378 ; U_U32.4@-20.805,83.935 -20.9,83.935 -20.9,86.378 ; C_U382.2@-16.3,80.9 -16.3,84.025 -18.654,86.378 -20.9,86.378 ; C_U382.2@-16.268,80.883 -16.268,79.129 -15.889,78.75 J_U326.1@-15.7,78.75
NetC_U482_2: C_U482.2 J_U426.1 R_U443.3 U_U42.4 | length 17.3
  Top Layer w0.4: 3.026,86.301 U_U42.4@3.684,86.301
  Top Layer w0.45: J_U426.1@-0.075,80.85 -0.075,80.876 0.319,81.27 0.731,81.27 2.284,82.823 2.284,83.113 C_U482.2@2.314,83.143 ; R_U443.3@1.37,95.365 2.575,94.16 2.575,86.753 3.026,86.301 2.35,85.625 C_U482.2@2.35,83.2
NetC_U582_2: C_U582.2 J_U526.1 R_U543.3 U_U52.4 | length 21
  Top Layer w0.4: J_U526.1@6.8,80.775 6.8,80.795 J_U526.1@6.817,80.812 8.951,82.946 C_U582.2@12.573,82.946 ; C_U582.2@12.575,82.975 12.558,82.992 12.558,85.547 13.307,86.297 ; R_U543.3@13.65,95.575 13.65,95.295 12.8,94.445 12.8,86.925 13.428,86.297 U_U52.4@14.172,86.297
NetC_U682_2: C_U682.2 J_U626.1 R_U643.3 U_U62.4 | length 9.7
  Top Layer w0.4: R_U643.3@-5.855,25.74 -5.855,31.26 -4.492,31.26 C_U682.2@-4.463,31.231 -4.433,31.261 -1.786,31.261 J_U626.1@-1.7,31.175
NetD10_2: D10.2 Q1.1 R33.2 | length 6.9
  Top Layer w0.5: D10.2@19.485,114.251 19.681,114.447 20.397,114.447 21.607,115.657 21.607,116.332 R33.2@21.85,116.575 ; R33.2@21.93,116.545 Q1.1@25.13,116.545
NetD_U19_2: D_U19.2 Q_U12.2 | length 2.2
  Top Layer w0.5: D_U19.2@-7.212,103.923 -7.125,103.837 -7.125,101.957 -7.096,101.927 Q_U12.2@-6.959,101.927
NetD_U29_2: D_U29.2 Q_U22.2 | length 1.9
  Top Layer w0.4: D_U29.2@25.638,99.475 25.638,97.634 25.672,97.6 Q_U22.2@25.675,97.6
NetD_U39_2: D_U39.2 Q_U32.2 | length 2.2
  Top Layer w0.5: Q_U32.2@-17.417,97.095 -17.433,97.111 -17.433,99.167 D_U39.2@-17.35,99.25
NetD_U49_2: D_U49.2 Q_U42.2 | length 2.2
  Top Layer w0.5: D_U49.2@4.275,104.1 4.333,104.042 4.333,101.932 4.304,101.902 Q_U42.2@4.291,101.902
NetD_U59_2: D_U59.2 Q_U52.2 | length 2
  Top Layer w0.5: Q_U52.2@15.695,101.874 D_U59.2@15.695,103.839
NetD_U69_2: D_U69.2 Q_U62.2 | length 2.2
  Top Layer w0.5: D_U69.2@-15.234,31.16 -15.16,31.086 -13.191,31.086 -13.162,31.056 Q_U62.2@-13.162,31.011
NetJ6_2: J6.2 U2.3 | length 11.2
  Top Layer w0.3: J6.2@-33.606,63.507 -31.475,61.375 -31.475,57.5 -29.096,55.121 -28.152,55.121 U2.3@-28.126,55.095
NetJ6_4: J6.4 U2.4 | length 9.6
  Top Layer w0.3: J6.4@-33.606,60.967 -32.25,59.61 -32.25,57.2 -29.495,54.445 U2.4@-28.126,54.445
NetJ6_6: J6.6 U2.5 | length 8
  Top Layer w0.3: J6.6@-33.606,58.427 -33.53,58.351 -33.53,57.405 -29.92,53.795 U2.5@-28.126,53.795
NetJ6_8: J6.8 U2.6 | length 6.6
  Top Layer w0.3: J6.8@-33.606,55.887 -33.337,55.887 -30.595,53.145 U2.6@-28.126,53.145
NetJ7_2: J7.2 U2.7 | length 5.7
  Top Layer w0.3: J7.2@-33.606,51.91 -33.281,51.91 -32.696,52.495 U2.7@-28.126,52.495
NetJ7_4: J7.4 U2.8 | length 6.5
  Top Layer w0.3: J7.4@-33.606,49.37 -31.131,51.845 U2.8@-28.126,51.845
NetJ7_6: J7.6 U2.9 | length 7.8
  Top Layer w0.3: J7.6@-33.606,46.83 -33.377,47.059 -33.377,47.898 -30.08,51.195 U2.9@-28.126,51.195
NetJ7_8: J7.8 U2.10 | length 11.7
  Top Layer w0.3: J7.8@-33.606,44.29 -30.735,44.29 -26.875,48.15 -26.875,50.05 -27.315,50.49 -28.071,50.49 U2.10@-28.126,50.545
NetJ8_1: J8.1 U3.10 | length 9.5
  Top Layer w0.3: U3.10@13.041,31.54 13.041,28.034 16.553,24.522 17.505,24.522 J8.1@17.577,24.45
NetJ8_3: J8.3 U3.9 | length 8.2
  Top Layer w0.3: U3.9@12.391,31.54 12.391,27.096 J8.3@15.037,24.45
NetJ8_5: J8.5 U3.8 | length 7.4
  Top Layer w0.3: U3.8@11.741,31.54 11.741,25.391 12.497,24.635 J8.5@12.497,24.45
NetJ8_7: J8.7 U3.7 | length 7.6
  Top Layer w0.3: J8.7@9.957,24.45 11.091,25.584 U3.7@11.091,31.54
NetJ9_1: J9.1 U3.6 | length 9.9
  Top Layer w0.3: J9.1@5.942,24.45 7.625,24.45 10.441,27.266 U3.6@10.441,31.54
NetJ9_3: J9.3 U3.5 | length 11.4
  Top Layer w0.3: J9.3@3.402,24.45 4.552,25.6 7.45,25.6 9.791,27.941 U3.5@9.791,31.54
NetJ9_5: J9.5 U3.4 | length 12.9
  Top Layer w0.3: J9.5@0.862,24.45 2.887,26.475 6.9,26.475 9.141,28.716 U3.4@9.141,31.54
NetJ9_7: J9.7 U3.3 | length 14.3
  Top Layer w0.3: J9.7@-1.678,24.45 1.373,27.501 6.476,27.501 8.491,29.516 U3.3@8.491,31.54
NetJ29_2: J29.2 R2.2 | length 7.2
  Top Layer w0.5: J29.2@-39.55,86.225 -39.55,89.749 -37.05,92.249 R2.2@-37.05,92.35
NetJ30_1: J30.1 R23.2 U2.22 | length 9.7
  Top Layer w0.3: R23.2@-24.24,57.725 -24.24,56.065 -23.325,55.15 -22.441,55.15 U2.22@-22.386,55.095
  Top Layer w0.45: J30.1@-25.51,62.799 -25.075,62.364 -25.075,58.225 -24.629,57.779 -24.295,57.779 R23.2@-24.24,57.725
NetJ31_1: J31.1 R24.2 U3.22 | length 9.9
  Top Layer w0.3: J31.1@0.87,34.65 0.882,34.65 1.457,34.075 5.25,34.075 5.675,34.5 5.675,34.992 R24.2@5.733,35.05 ; R24.2@5.833,35.05 7.182,35.05 8.453,36.322 8.453,37.242 U3.22@8.491,37.28
NetJ_U127_1: J_U127.1 U_U12.1 | length 8
  Top Layer w0.4: J_U127.1@-7.236,89.412 -7.23,89.405 -5.979,89.405 -4.175,87.601 -4.175,85.225 -4.748,84.652 U_U12.1@-5.7,84.652
NetJ_U227_1: J_U227.1 U_U22.1 | length 4.4
  Top Layer w0.4: J_U227.1@24.4,88.03 23.95,87.58 23.95,84.825 24.282,84.493 U_U22.1@24.828,84.493
NetJ_U327_1: J_U327.1 U_U32.1 | length 7.2
  Top Layer w0.4: U_U32.1@-17.935,82.035 -17.267,82.035 -17.002,82.3 v2(-17,82.3)
  Bottom Layer w0.5: J_U327.1@-18.75,87.722 -18.425,87.397 -18.425,83.975 -17.762,83.312 -17.762,83.062 v2(-17,82.3)
NetJ_U427_1: J_U427.1 U_U42.1 | length 8.7
  Top Layer w0.4: U_U42.1@6.554,84.401 7.326,84.401
  Top Layer w0.5: 7.326,84.401 8.175,85.25 8.175,87.386 7.443,88.118 v2(7.443,88.121)
  Bottom Layer w0.5: J_U427.1@4.513,89.723 5.856,89.723 7.441,88.137 7.441,88.122 v2(7.443,88.121)
NetJ_U527_1: J_U527.1 U_U52.1 | length 7.7
  Top Layer w0.4: U_U52.1@17.042,84.397 17.894,84.397 19.105,85.608 19.105,86.13 v1(19.15,86.175)
  Bottom Layer w0.5: J_U527.1@16.85,89.805 19.15,87.505 v1(19.15,86.175)
NetJ_U627_1: J_U627.1 U_U62.1 | length 3.4
  Top Layer w0.4: J_U627.1@-10.075,35.725 -10.075,34.15 -9.085,33.16 U_U62.1@-8.679,33.16
NetQ_U12_1: Q_U12.1 R_U131.2 U_U12.3 | length 14.1
  Top Layer w0.4: U_U12.3@-5.7,86.552 -5.7,87.458 v2(-5.366,87.792)
  Top Layer w0.5: Q_U12.1@-6.574,99.993 -6.574,99.899 -5.641,98.966 R_U131.2@-5.641,94.61 -5.332,94.301 -5.332,89.686 v2(-5.331,89.685)
  Bottom Layer w0.5: v2(-5.366,87.792) -5.366,89.647 -5.331,89.683 v2(-5.331,89.685)
NetQ_U12_3: Q_U12.3 R_U132.1 | length 2.2
  Top Layer w0.5: R_U132.1@-11.025,100.8 -10.85,100.975 Q_U12.3@-9.041,100.975 ; R_U132.1@-11.025,100.802 R_U132.1@-11.025,100.93
NetQ_U22_1: Q_U22.1 R_U231.2 U_U22.3 | length 16.6
  Top Layer w0.4: R_U231.2@22.4,93.5 22.525,93.375 22.525,83.806 23.738,82.593 U_U22.3@24.828,82.593 ; R_U231.2@22.525,93.4 24.696,95.571 25.446,95.571 Q_U22.1@25.6,95.725
NetQ_U22_3: Q_U22.3 R_U232.1 | length 2.4
  Top Layer w0.5: R_U232.1@21.25,96.5 21.349,96.599 23.563,96.599 Q_U22.3@23.567,96.602
NetQ_U32_1: Q_U32.1 R_U331.2 U_U32.3 | length 12.2
  Top Layer w0.4: U_U32.3@-17.935,83.935 -17.765,83.935 -17.765,84.456 -17.725,84.496 v2(-17.725,84.525)
  Top Layer w0.5: Q_U32.1@-17.417,95.19 -17.41,95.19 -17.38,95.16 R_U331.2@-17.38,92.862 ; R_U331.2@-17.4,92.925 -17.4,92.882 -16.799,92.281 v2@-16.799,85.904
  Bottom Layer w0.5: v2(-17.725,84.525) -16.8,85.45 -16.8,85.898 v2@-16.799,85.9
  other v2: -16.799,85.902
NetQ_U32_3: Q_U32.3 R_U332.1 | length 2.1
  Top Layer w0.5: R_U332.1@-21.62,96.145 -19.502,96.145 Q_U32.3@-19.5,96.142
NetQ_U42_1: Q_U42.1 R_U431.2 U_U42.3 | length 14.4
  Top Layer w0.4: Q_U42.1@4.676,99.968 4.726,99.918 4.726,99.901 6.55,98.078 R_U431.2@6.55,95.15 ; R_U431.2@6.222,94.925 6.554,94.593 U_U42.3@6.554,86.301
NetQ_U42_3: Q_U42.3 R_U432.1 | length 2.3
  Top Layer w0.5: R_U432.1@-0.05,100.95 Q_U42.3@2.209,100.95
NetQ_U52_1: Q_U52.1 R_U531.2 U_U52.3 | length 15.7
  Top Layer w0.4: U_U52.3@17.042,86.297 17.622,86.297 18.1,86.775
  Top Layer w0.5: Q_U52.1@15.925,99.875 18.5,97.3 R_U531.2@18.5,95.15 ; 18.1,86.775 18.625,87.3 R_U531.2@18.625,95.2
NetQ_U52_3: Q_U52.3 R_U532.1 | length 2.4
  Top Layer w0.5: R_U532.1@11.255,100.9 Q_U52.3@13.634,100.9
NetQ_U62_1: Q_U62.1 R_U631.2 U_U62.3 | length 7.2
  Top Layer w0.4: R_U631.2@-11.034,26.675 -11.034,30.433 -11.257,30.656 -11.257,31.181 -11.177,31.26 U_U62.3@-8.679,31.26
NetQ_U62_3: Q_U62.3 R_U632.1 | length 2.9
  Top Layer w0.5: R_U632.1@-15.111,28.929 Q_U62.3@-12.209,28.929
NetR21_2: R21.2 U2.2 | length 3.8
  Top Layer w0.3: U2.2@-28.126,55.745 -26.73,55.745 -25.85,56.625 R21.2@-25.85,57.775
NetR22_2: R22.2 U3.2 | length 3.1
  Top Layer w0.3: R22.2@5.837,32.842 7.408,32.842 7.786,32.464 7.786,31.595 U3.2@7.841,31.54
NetR25_1: R25.1 U2.11 | length 2.1
  Top Layer w0.3: R25.1@-30.091,49.644 -30.066,49.644 -29.815,49.895 U2.11@-28.126,49.895
NetR26_1: R26.1 U3.11 | length 3.4
  Top Layer w0.3: U3.11@13.691,31.54 13.691,28.589 13.98,28.3 R26.1@14,28.3
NetR_U17_2: R_U17.2 R_U143.2 U_U12.5 | length 15.9
  Top Layer w0.4: v2(-9,85.9) -8.979,85.879 -8.979,85.791 -8.79,85.602 U_U12.5@-8.57,85.602
  Top Layer w0.5: R_U17.2@-14.925,86.875 -14.925,91.5 R_U143.2@-13.625,92.8
  Bottom Layer w0.5: R_U143.2@-13.65,92.775 -13.615,92.74 -13.615,91.109 -9.002,86.496 -9.002,85.902 v2(-9,85.9)
NetR_U27_2: R_U27.2 R_U243.2 U_U22.5 | length 12.2
  Top Layer w0.4: U_U22.5@27.698,83.543 27.918,83.543 31.075,86.7 R_U243.2@31.075,86.75 ; R_U243.2@31.16,86.885 31.16,88.186 34.099,91.125 R_U27.2@36.15,91.125
NetR_U37_2: R_U37.2 R_U343.2 U_U32.5 | length 9.4
  Top Layer w0.4: R_U343.2@-25.625,88.65 -25.595,88.62 -25.595,86.969 -22.575,83.949 R_U37.2@-22.575,82.5 -22.09,82.985 U_U32.5@-20.805,82.985
NetR_U47_2: R_U47.2 R_U443.2 U_U42.5 | length 16.6
  Top Layer w0.4: v2(3.15,85.4) 3.179,85.4 3.228,85.351 U_U42.5@3.684,85.351
  Top Layer w0.5: R_U47.2@-2.925,86.725 -2.925,91.07 R_U443.2@-1.17,92.825
  Bottom Layer w0.5: R_U443.2@-1.175,92.825 -1.17,92.82 -1.17,91.119 3.15,86.799 v2(3.15,85.4)
NetR_U57_2: R_U57.2 R_U543.2 U_U52.5 | length 12.7
  Top Layer w0.4: v1(13.275,85.25) 13.325,85.25 13.422,85.347 U_U52.5@14.172,85.347
  Top Layer w0.5: R_U57.2@8.725,91.15 R_U57.2@8.725,91.175 9.05,91.5 9.855,91.5 R_U543.2@11.23,92.875
  Bottom Layer w0.5: R_U543.2@11.23,92.875 11.375,92.875 12.55,91.7 12.55,85.975 v1(13.275,85.25)
NetR_U67_2: R_U67.2 R_U643.2 U_U62.5 | length 16.7
  Top Layer w0.4: U_U62.5@-5.809,32.21 -4.412,32.21 -4.377,32.175 v2(-4.375,32.175)
  Top Layer w0.5: R_U67.2@-10.875,21.375 -9.172,23.078 -8.547,23.078 R_U643.2@-8.4,23.225
  Bottom Layer w0.5: R_U643.2@-8.395,23.2 -7.023,23.2 -3.65,26.573 -3.65,31.448 -4.373,32.171 v2@-4.373,32.173
TIA_EXT: J2.1 J16.3 | length 31.3
  Top Layer w0.5: J16.3@-29.35,86.265 -28,87.615 -28,98.075 -17.38,108.695 J2.1@-17.38,112.372 -17.38,112.47 J2.1@-17.3,112.55
VDD_0P8V: C39.2 C40.2 R9.2 U4.1 | length 6.9
  Top Layer w0.5: U4.1@1.984,69.665 2.102,69.783 2.102,70.577 4.023,72.498 4.023,72.728 4.07,72.775 C39.2@4.07,74.075 ; C39.2@4.082,74.075 R9.2@4.082,75.747
VDD_1P8V: C43.2 C47.2 R17.2 U4.6 | length 12
  Top Layer w0.45: C47.2@-7.578,72.575 -7.578,69.728 -4.283,66.433 U4.6@-4.283,64.872 ; C43.2@-7.573,74.025 -7.573,75.427 R17.2@-7.5,75.5 ; C47.2@-7.568,72.585 C43.2@-7.568,74.02